# Altium PCB main.PcbDoc (part 1 of 2)
Units mm, origin at the board's own origin, x right, y up, seen from the top; angles counter-clockwise.
Board outline 90 x 95 mm, 4 copper layers (Top L1, GND L2, CLK L3, Bot GND L4), stack 1.59 mm thick; 88 components, 60 nets, 501 pads, 675 vias.
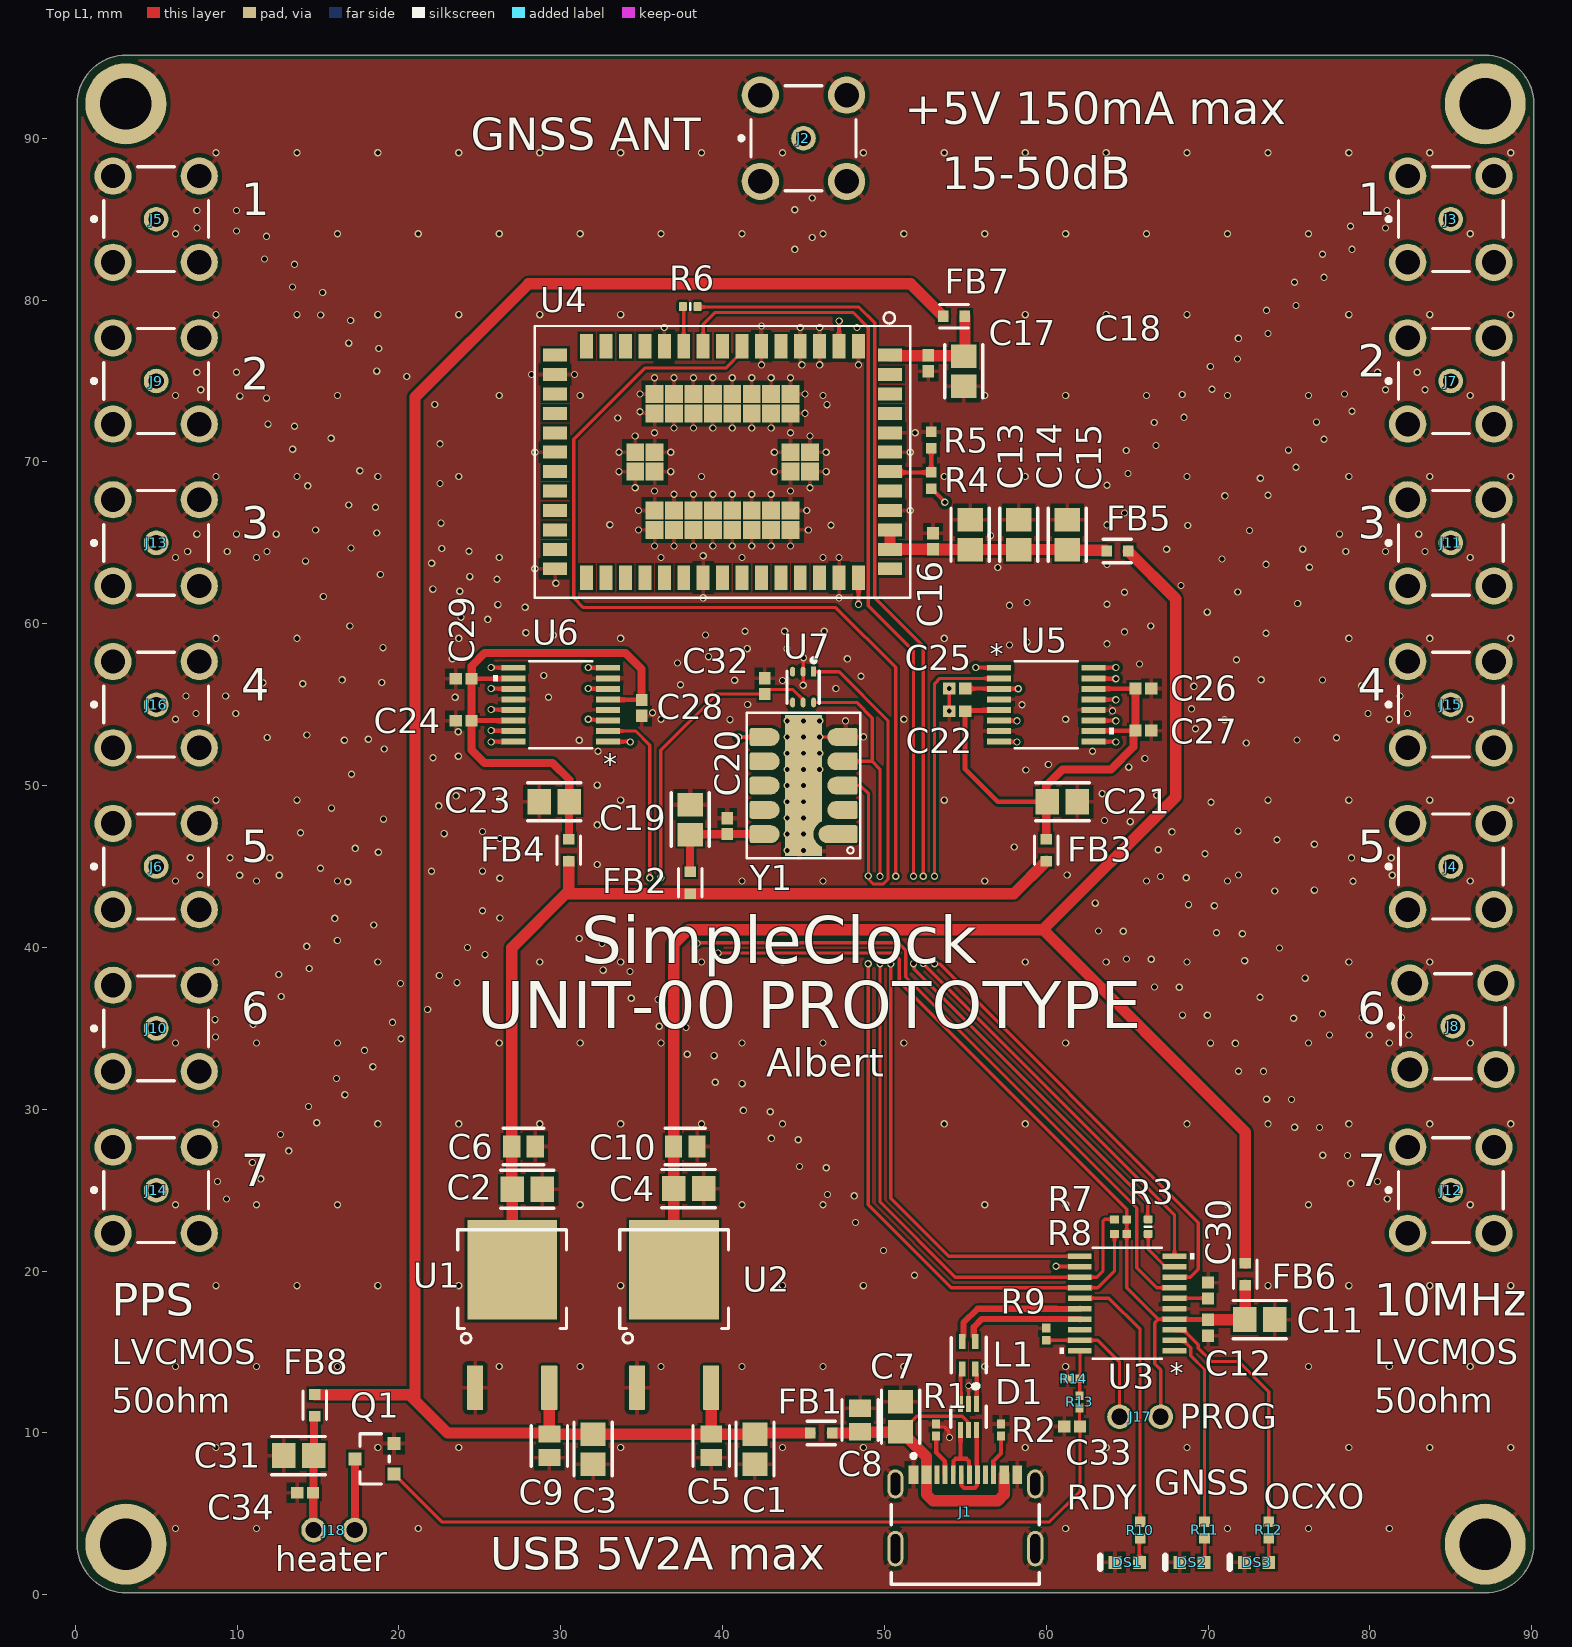
[diagram p0: Top L1 view]
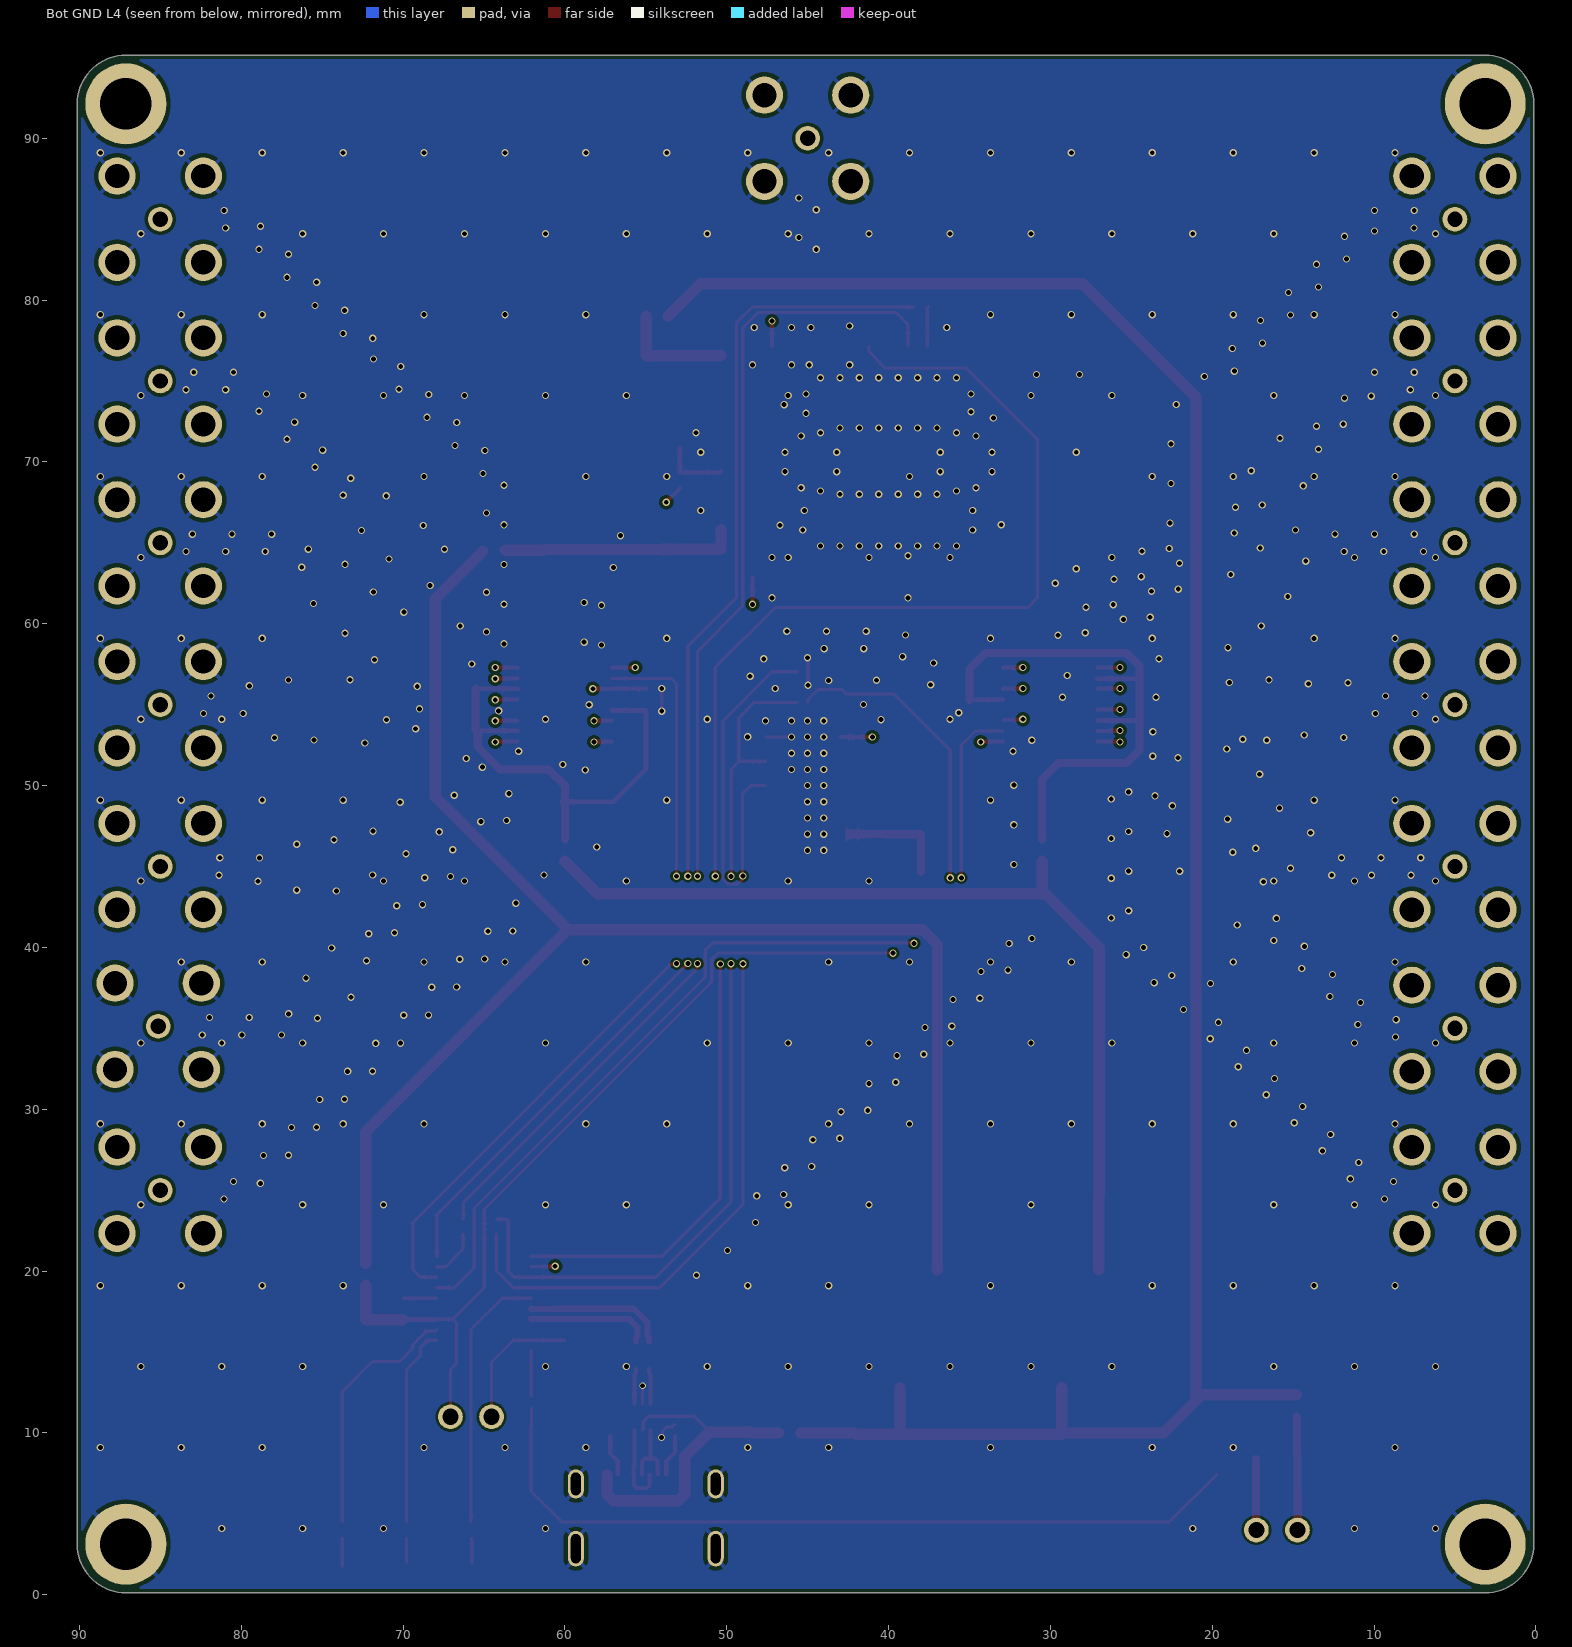
[diagram p1: Bot GND L4 view, seen from below]
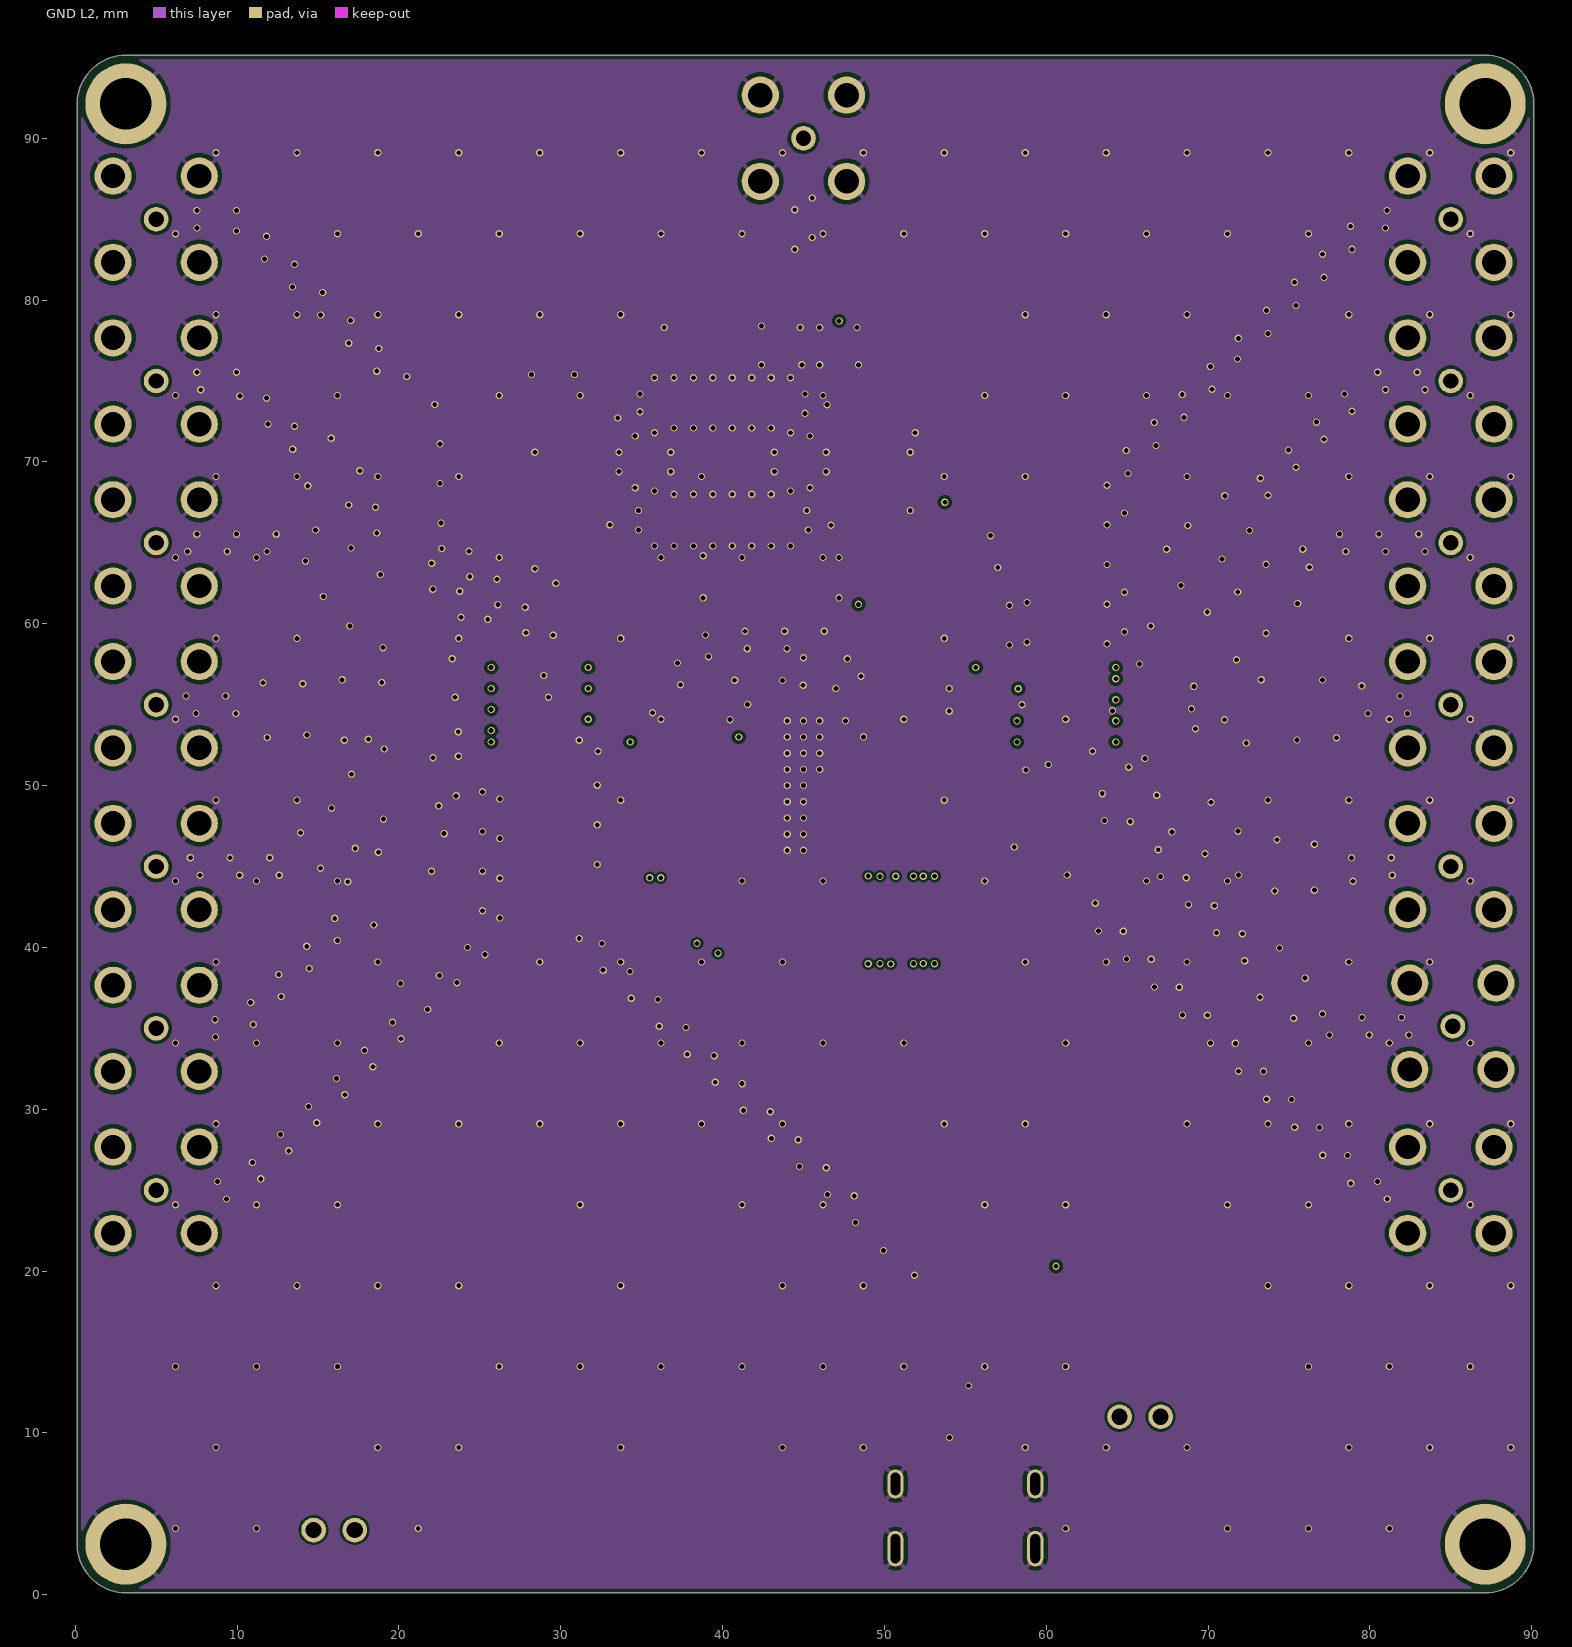
[diagram p2: GND L2]
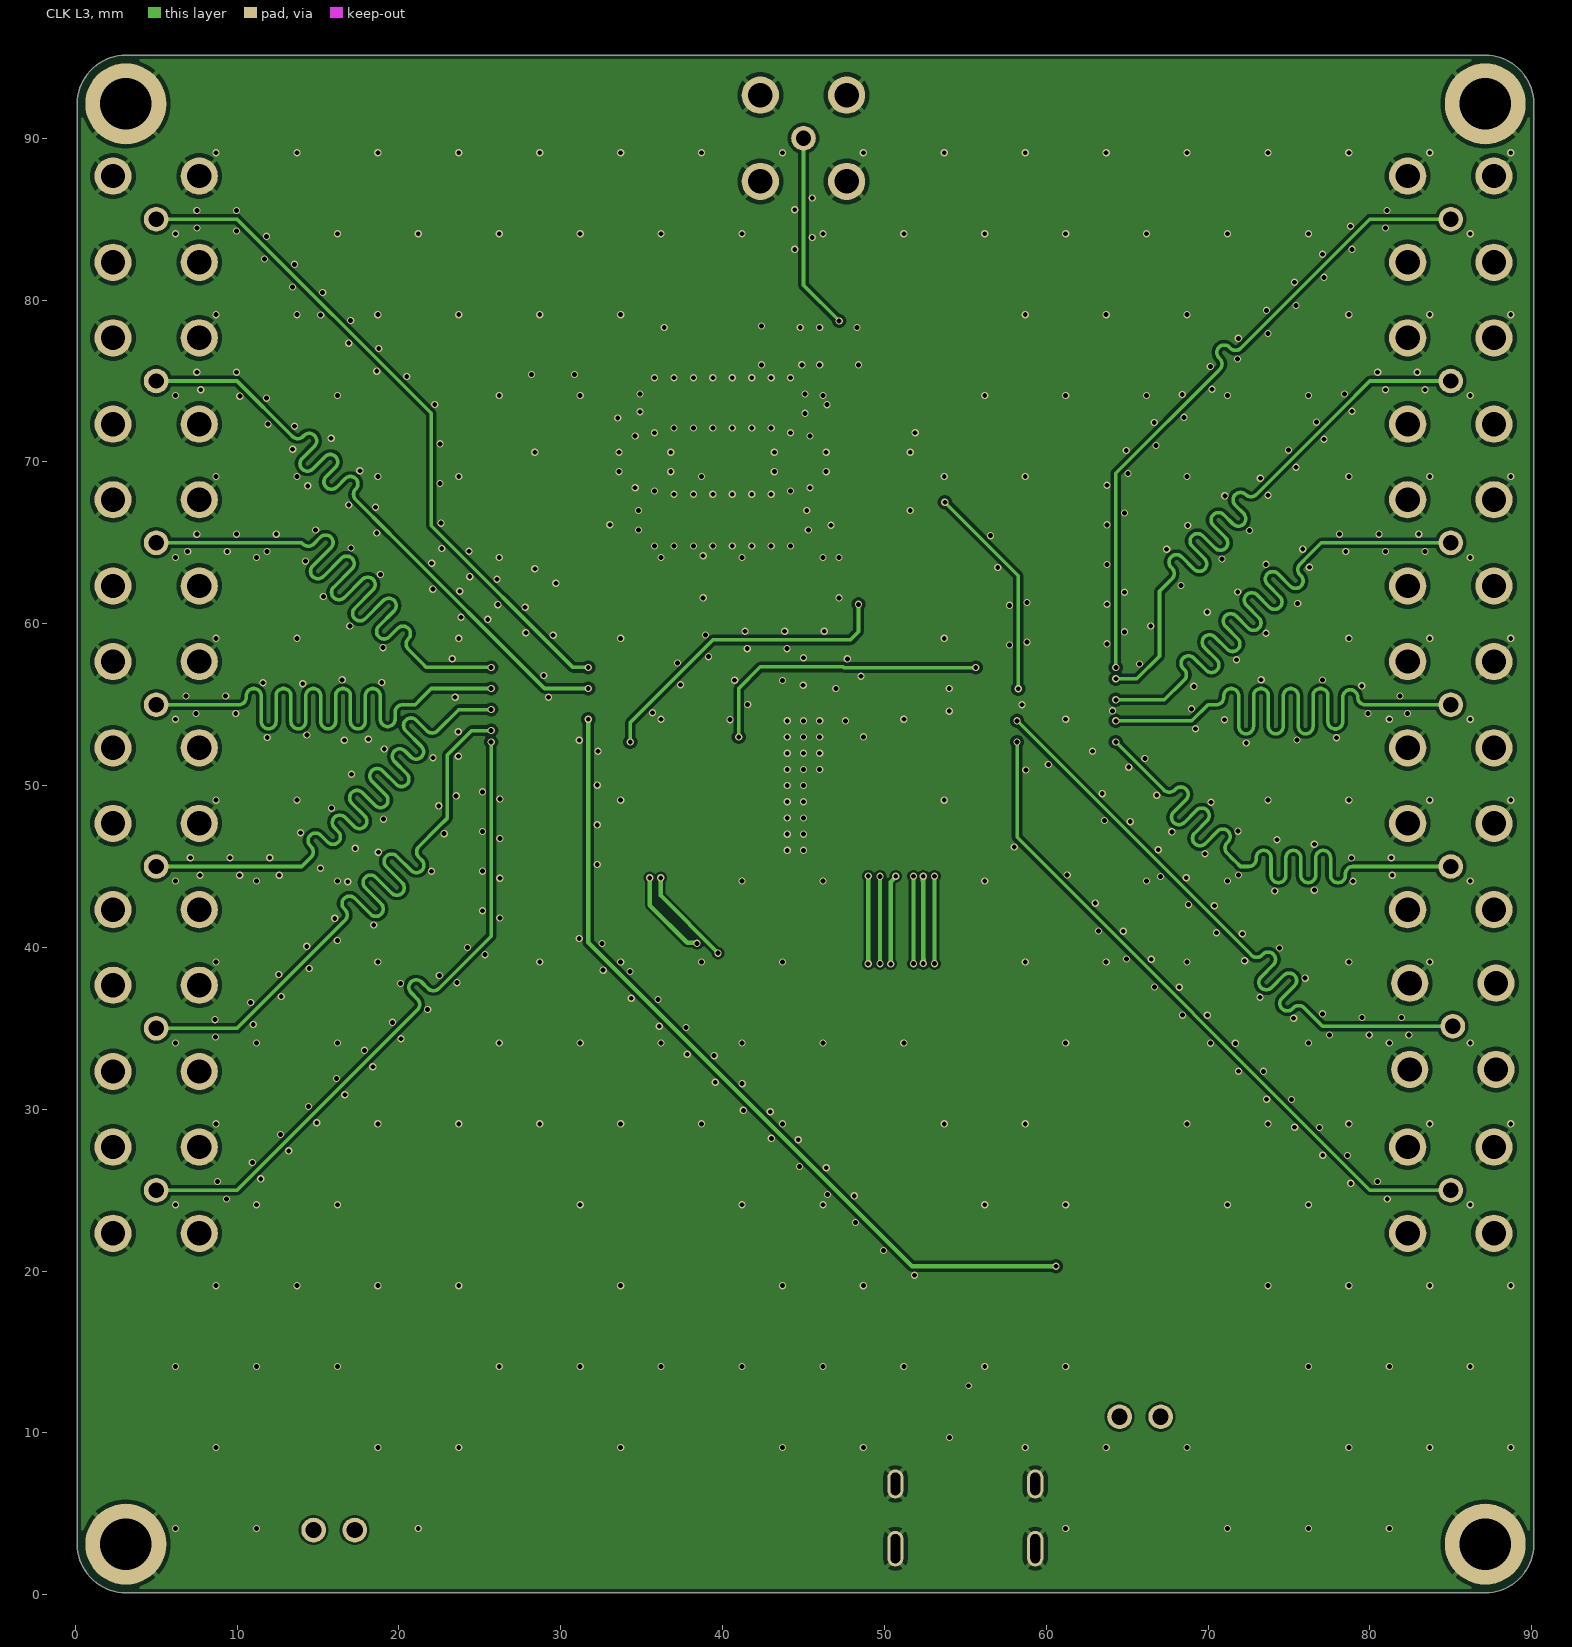
[diagram p3: CLK L3]
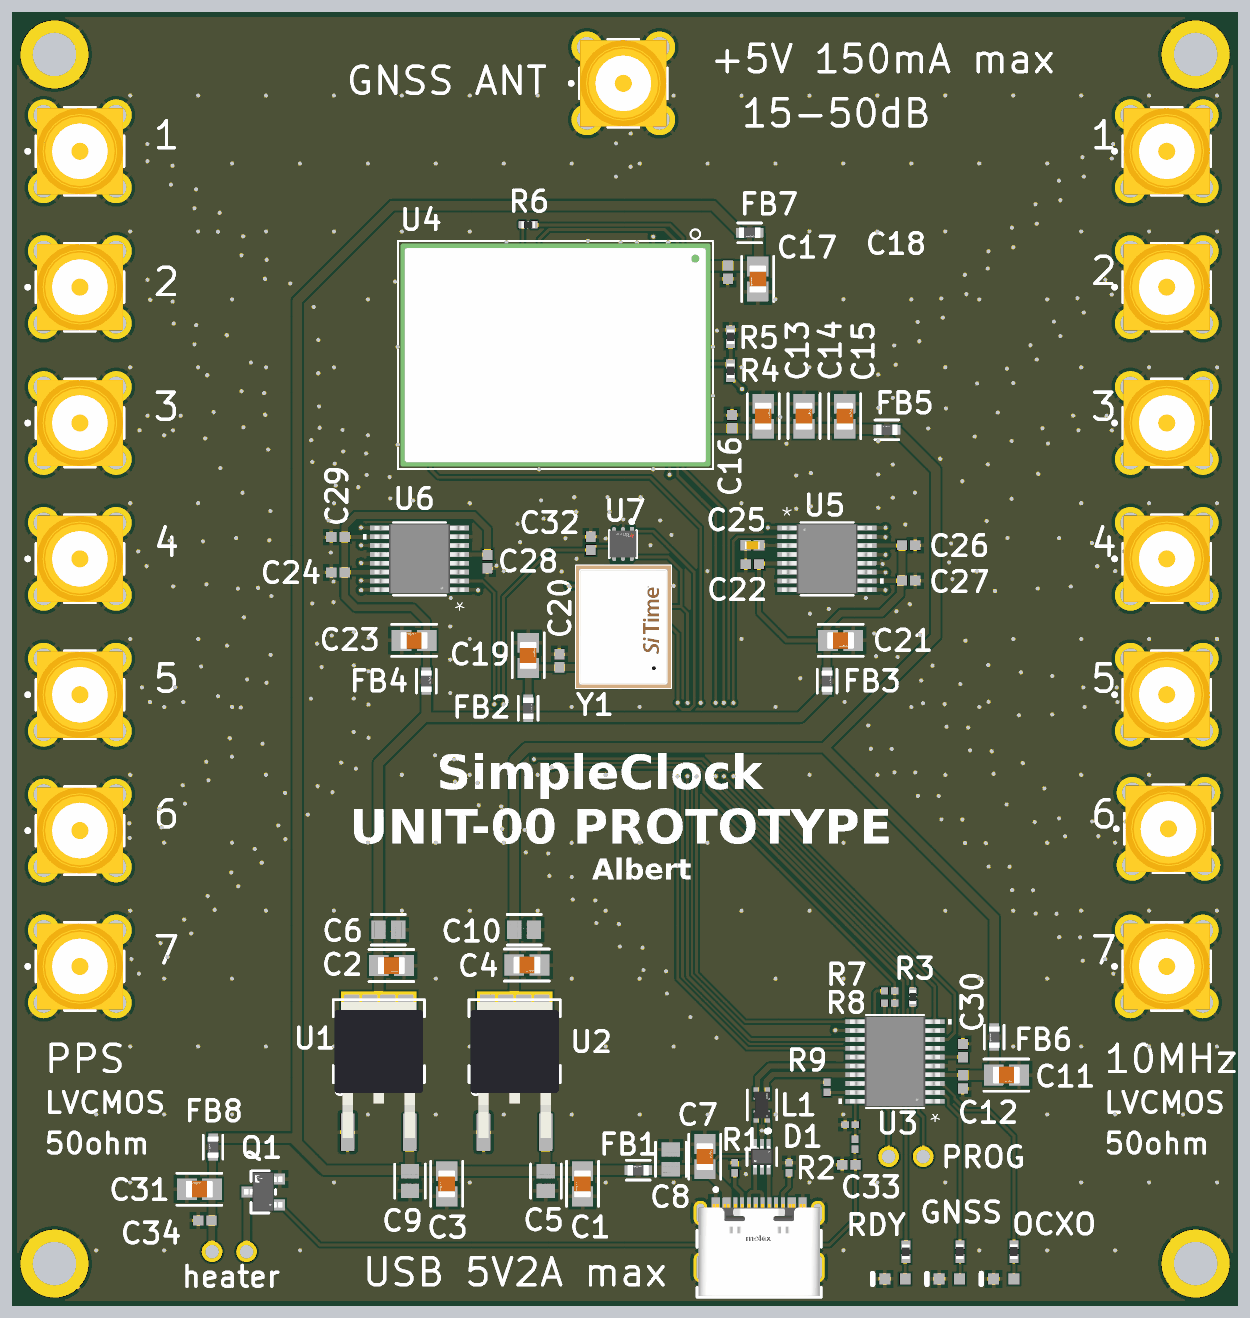
[diagram p5: 3D render of the assembled board from above, using the file's embedded part models]

## Layer stack, top to bottom
Top Solder: solder mask 0.0305, Solder Resist, Dk 3.8
Top L1: signal copper 0.035
Dielectric 2: prepreg 0.2104, 7628, Dk 4.4
GND L2: signal copper 0.0175
Dielectric 1: dielectric 1.064, FR-4, Dk 4.6
CLK L3: signal copper 0.0175
Dielectric 3: prepreg 0.2104, 7628, Dk 4.4
Bot GND L4: signal copper 0.035
Bottom Solder: solder mask 0.0305, Solder Resist, Dk 3.8

## Board outline
0.127,3.127 0.127,92.127 cw(c3.127,92.127) 3.127,95.127 87.127,95.127 cw(c87.127,92.127) 90.127,92.127 90.127,3.127 cw(c87.127,3.127) 87.127,0.127 3.127,0.127 cw(c3.127,3.127)

## Design rules (kind name [scope] priority, off if disabled: settings)
AssemblyTestPointUsage [All] p1: isadvanced=TRUE
AssemblyTestpoint [All] p1: isadvanced=TRUE testpointundercomponent=TRUE minsize=1.016 maxsize=2.54 preferedsize=1.524 minholesize=0 maxholesize=1.016 preferedholesize=0.813 testpointgrid=0.025 usegrid=TRUE gridtolerance=0 allowsidetop=TRUE allowsidebottom=TRUE
BoardOutlineClearance [All] p1: isadvanced=TRUE gap=0.25 ignorepadtopadclearanceinfootprint=FALSE
Clearance 50ohm_clearance [InNetClass('50ohm') vs InNet('GND')] p1: isadvanced=TRUE gap=0.2 ignorepadtopadclearanceinfootprint=TRUE
Clearance Clearance_1 [(ExistsOnLayer('GND L2') Or ExistsOnLayer('CLK L3')) vs (ExistsOnLayer('GND L2') Or ExistsOnLayer('CLK L3'))] p2: gap=0.15 ignorepadtopadclearanceinfootprint=FALSE except(0.1: Arc-Arc Arc-Track Arc-SMDPad Arc-THPad Arc-Text Arc-Hole Track-Track Track-SMDPad Track-THPad Track-Text Track-Hole SMDPad-Text THPad-Text Text-Text Text-Hole) sourcerule=49 cellrowname=All cellrowtype=0 cellcolname=All cellcoltype=0 innerlayers=TRUE
Clearance Clearance_2 [(ExistsOnLayer('Top L1') Or ExistsOnLayer('Bot GND L4')) vs (ExistsOnLayer('Top L1') Or ExistsOnLayer('Bot GND L4'))] p3: gap=0.15 ignorepadtopadclearanceinfootprint=FALSE except(0.1: Arc-Arc Arc-Track Arc-SMDPad Arc-THPad Arc-Text Arc-Hole Track-Track Track-SMDPad Track-THPad Track-Text Track-Hole SMDPad-Text THPad-Text Text-Text Text-Hole) sourcerule=49 cellrowname=All cellrowtype=0 cellcolname=All cellcoltype=0 outerlayers=TRUE
Clearance [All] p4: gap=0.15 ignorepadtopadclearanceinfootprint=FALSE ismatrix=TRUE
ComponentClearance [All] p1: isadvanced=TRUE gap=0.254 collisioncheckmode=3 verticalgap=0.254 showdistances=FALSE
DiffPairsRouting "Schematic Differential Pairs Routing_1" [InDifferentialPairClass('USB_90ohm')] p1: maxlimit=0.254 minlimit=0.2 mostfreqgap=0.254 toplayer_maxgap=0.2 toplayer_prefgap=0.2 toplayer_minwidth=0.26 toplayer_maxwidth=0.26 toplayer_prefwidth=0.26 bottomlayer_maxgap=0.2 bottomlayer_prefgap=0.2 bottomlayer_minwidth=0.26 bottomlayer_maxwidth=0.26 bottomlayer_prefwidth=0.26 impedanceprofiledriven=TRUE impedanceprofileid={2F02EFE7-A818-4EB9-8A8D-3B14D2CF868C} impedanceprofilevalue=90.000000 maxuncoupledlength=12.7
DiffPairsRouting "Schematic Differential Pairs Routing" [InDifferentialPairClass('All Differential Pairs')] p2: maxlimit=0.254 minlimit=0.1 mostfreqgap=0.254 toplayer_minwidth=0.1 toplayer_maxwidth=3 toplayer_prefwidth=0.381 midlayer1_mingap=0.254 midlayer1_minwidth=0.381 midlayer1_maxwidth=0.381 midlayer1_prefwidth=0.381 midlayer2_mingap=0.254 midlayer2_minwidth=0.381 midlayer2_maxwidth=0.381 midlayer2_prefwidth=0.381 bottomlayer_minwidth=0.1 bottomlayer_maxwidth=3 bottomlayer_prefwidth=0.381 maxuncoupledlength=12.7
DiffPairsRouting [All] p3: maxlimit=0.254 minlimit=0.254 mostfreqgap=0.254 toplayer_minwidth=0.381 toplayer_maxwidth=0.381 toplayer_prefwidth=0.381 midlayer1_minwidth=0.381 midlayer1_maxwidth=0.381 midlayer1_prefwidth=0.381 midlayer2_minwidth=0.381 midlayer2_maxwidth=0.381 midlayer2_prefwidth=0.381 bottomlayer_minwidth=0.381 bottomlayer_maxwidth=0.381 bottomlayer_prefwidth=0.381 maxuncoupledlength=12.7
FabricationTestPointUsage [All] p1: isadvanced=TRUE valid=0 allowmultiple=FALSE
FabricationTestpoint [All] p1: isadvanced=TRUE side=3 testpointundercomponent=TRUE minsize=1.016 maxsize=2.54 preferedsize=1.524 minholesize=0 maxholesize=1.016 preferedholesize=0.813 testpointgrid=0.025 allowsidetop=TRUE allowsidebottom=TRUE usegrid=TRUE gridtolerance=0
FanoutControl Fanout_BGA [IsBGA] p1: isadvanced=TRUE bgadir=Out bgaviamode=Centered fanoutstyle=Auto fanoutdirection=Alternating viagrid=0.025 // Fanout_BGA (Default Rule)
FanoutControl Fanout_LCC [IsLCC] p2: isadvanced=TRUE bgadir=Out bgaviamode=Centered fanoutstyle=Auto fanoutdirection=Alternating viagrid=0.025 // Fanout_LCC (Default Rule)
FanoutControl Fanout_SOIC [IsSOIC] p3: isadvanced=TRUE bgadir=Out bgaviamode=Centered fanoutstyle=Auto fanoutdirection=Alternating viagrid=0.025 // Fanout_SOIC (Default Rule)
FanoutControl Fanout_Small [(CompPinCount < 5)] p4: isadvanced=TRUE bgadir=Out bgaviamode=Centered fanoutstyle=Auto fanoutdirection=OutThenIn viagrid=0.025 // Fanout_Small (Default Rule)
FanoutControl Fanout_Default [All] p5: isadvanced=TRUE bgadir=Out bgaviamode=Centered fanoutstyle=Auto fanoutdirection=Alternating viagrid=0.025 // Fanout_Default (Default Rule)
Height [All] p1: isadvanced=TRUE minheight=0 maxheight=25.4 prefheight=12.7
HoleSize [All] p1: isadvanced=TRUE absolutevalues=TRUE maxlimit=10 minlimit=0.3 maxpercent=80.000 minpercent=20.000
HoleToHoleClearance [All] p1: isadvanced=TRUE gap=0.2 allowstackedmicrovias=TRUE
LayerPairs [All] p1: isadvanced=TRUE enforce=TRUE
MatchedLengths MatchedLengths_1 [InNetClass('PPS_match')] p1: isadvanced=TRUE tolerance=25.4 checknetsindiffpair=FALSE checkdiffpairvsdiffpair=TRUE checkxsignals=TRUE checkothers=TRUE usedelayunits=TRUE delaytolerance=10.000000
MatchedLengths 10MHz_match [InNetClass('10MHz_match')] p2: isadvanced=TRUE tolerance=25.4 checknetsindiffpair=FALSE checkdiffpairvsdiffpair=TRUE checkxsignals=TRUE checkothers=TRUE usedelayunits=TRUE delaytolerance=10.000000
MinimumAnnularRing [IsVia] p1: isadvanced=TRUE minimumring=0.05
MinimumSolderMaskSliver [All] p1: isadvanced=TRUE minsoldermaskwidth=0.13
NetAntennae [All] p1: isadvanced=TRUE netantennaetolerance=0
PasteMaskExpansion [All] p1: isadvanced=TRUE expansion=0
PlaneClearance [All] p1: isadvanced=TRUE clearance=0.508
PlaneConnect [All] p1: isadvanced=TRUE planeconnectstyle=Relief reliefexpansion=0.508 reliefentries=4 reliefconductorwidth=0.3 reliefairgap=0.2
PolygonConnect PolygonConnectStyle_1 [InNet('GND')] p1: isadvanced=TRUE thpad.connectstyle=Relief thpad.reliefconductorwidth=0.254 thpad.reliefentries=4 thpad.polygonreliefangle="45 Angle" thpad.airgapwidth=0.254 smdpad.connectstyle=Relief smdpad.reliefconductorwidth=0.254 smdpad.reliefentries=4 smdpad.polygonreliefangle="45 Angle" smdpad.airgapwidth=0.254 smdpad.conductorbypadedge=TRUE smdpad.mindistance=0.254 smdpad.enablemindistance=FALSE via.connectstyle=Direct via.reliefconductorwidth=0.254 via.reliefentries=2 via.polygonreliefangle="0 Angle" via.airgapwidth=0.254
PolygonConnect [All] p2: connectstyle=Relief reliefconductorwidth=0.254 reliefentries=4 polygonreliefangle="90 Angle" airgapwidth=0.254
RoutingCorners [All] p1: isadvanced=TRUE cornerstyle=45-Degree minsetback=2.54 maxsetback=2.54
RoutingPriority [All] p1: isadvanced=TRUE routingpriority=0
RoutingVias [All] p1: holewidth=0.3 width=0.45 viastyle="Through Hole" minholewidth=0.3 minwidth=0.4 maxholewidth=3 maxwidth=3
ShortCircuit [All] p1: isadvanced=TRUE allowed=FALSE
SilkToSilkClearance [All] p1: isadvanced=TRUE silktosilkclearance=0.254
SilkToSolderMaskClearance [IsPad] p1: isadvanced=TRUE minsilkscreentomaskgap=0.25 clearancetoexposedcopper=TRUE
SolderMaskExpansion ViaTenting [IsVia] p1: isadvanced=TRUE expansion=0 istentingtop=TRUE useseparateexpansions=TRUE expansionbottom=0 istentingbottom=TRUE
SolderMaskExpansion [All] p2: isadvanced=TRUE expansion=0.05 istentingtop=FALSE
SupplyNets "Schematic Supply Nets_2" [InNet('GND')] p1: isadvanced=TRUE voltage=0.000
SupplyNets "Schematic Supply Nets_1" [InNet('IN_5V')] p2: isadvanced=TRUE voltage=0.000
SupplyNets "Schematic Supply Nets" [InNet('USB_5V')] p3: isadvanced=TRUE voltage=0.000
UnRoutedNet [All] p1: isadvanced=TRUE
UnpouredPolygon [All] p1: isadvanced=TRUE
Width MaxMinWidth_1 [InNetClass('50ohm')] p1: maxlimit=0.248 minlimit=0.22 preferedwidth=0.248 toplayer_minwidth=0.248 midlayer1_maxwidth=0.22 midlayer1_prefwidth=0.22 midlayer2_maxwidth=0.22 midlayer2_prefwidth=0.22 bottomlayer_minwidth=0.248 impedanceprofiledriven=TRUE impedanceprofileid={BEF96867-CBA8-4214-9458-3ECCB896C18F} impedanceprofilevalue=50.000000 minimp=50.000000 maximp=50.000000 favimp=50.000000
Width [All] p2: maxlimit=3 minlimit=0.1 preferedwidth=0.254 toplayer_prefwidth=0.2 midlayer1_minwidth=0.254 midlayer1_maxwidth=0.254 midlayer2_minwidth=0.254 midlayer2_maxwidth=0.254 bottomlayer_prefwidth=0.2 minimp=50.000000 maximp=50.000000 favimp=50.000000
3 further rules are at their usual default settings.

## Classes and differential pairs
net class PPS_match: PPS_1 PPS_2 PPS_3 PPS_4 PPS_5 PPS_6 PPS_7
net class 10MHz_match: 10MHz_1 10MHz_2 10MHz_3 10MHz_4 10MHz_5 10MHz_6 10MHz_7
differential pair class USB_90ohm: D USB_D
net class 50ohm: 10MHz 10MHz_1 10MHz_2 10MHz_3 10MHz_4 10MHz_5 10MHz_6 10MHz_7 10MHz_ref GPS_ANT NetR4_1 PPS PPS_1 PPS_2 PPS_3 PPS_4 PPS_5 PPS_6 PPS_7 PPS_ref
component class Power_IO: C1 C2 C3 C4 C5 C6 C7 C8 C9 C10 D1 FB1 FB2 FB3 FB4 FB5 FB6 FB7 J1 L1 R1 R2 U1 U2
component class Output_Distribute: C21 C22 C23 C24 C25 C26 C27 C28 C29 J3 J4 J5 J6 J7 J8 J9 J10 J11 J12 J13 J14 J15 J16 U5 U6
component class MCU: C11 C12 C30 C31 C32 C33 C34 DS1 DS2 DS3 FB8 J17 J18 Q1 R3 R7 R8 R9 R10 R11 R12 R13 R14 U3 U7
component class clocks: C13 C14 C15 C16 C17 C18 C19 C20 J2 R4 R5 R6 U4 Y1
differential pair USB_D: +USB_D_P -USB_D_N
differential pair D: +D_P -D_N

## Components (designator, comment, footprint, x,y, rotation, side; value= is the part's Value field where it differs from the comment)
C1 "10uF" FP-GRM21B-0_2-e0_2_0_7-IPC_A 42,9 r270 top
C2 "10uF" FP-GRM21B-0_2-e0_2_0_7-IPC_A 27.929,25.061 r0 top
C3 "10uF" FP-GRM21B-0_2-e0_2_0_7-IPC_A 32,9 r270 top
C4 "10uF" FP-GRM21B-0_2-e0_2_0_7-IPC_A 37.9,25.1 r0 top
C5 "1uF" FP-CL21-IPC_C 39.3,9.2 r270 top
C6 "1uF" FP-CL21-IPC_C 27.7,27.7 r0 top
C7 "10uF" FP-GRM21B-0_2-e0_2_0_7-IPC_A 51,11 r90 top
C8 "1uF" FP-CL21-IPC_C 48.5,10.8 r90 top
C9 "1uF" FP-CL21-IPC_C 29.3,9.2 r270 top
C10 "1uF" FP-CL21-IPC_C 37.7,27.7 r0 top
C11 "10uF" FP-GRM21B-0_2-e0_2_0_7-IPC_A 73.2,17 r0 top
C12 "100nF" CAPC1050X55X23ML05T13 70,16.5 r270 top
C13 "10uF" FP-GRM21B-0_2-e0_2_0_7-IPC_A 55.3,65.5 r90 top
C14 "10uF" FP-GRM21B-0_2-e0_2_0_7-IPC_A 58.3,65.5 r90 top
C15 "10uF" FP-GRM21B-0_2-e0_2_0_7-IPC_A 61.3,65.5 r90 top
C16 "100nF" CAPC1050X55X23ML05T13 53,65.1 r90 top
C17 "10uF" FP-GRM21B-0_2-e0_2_0_7-IPC_A 54.9,75.6 r270 top
C18 "100nF" CAPC1050X55X23ML05T13 52.7,76.1 r270 top
C19 "10uF" FP-GRM21B-0_2-e0_2_0_7-IPC_A 38,47.9 r90 top
C20 "100nF" CAPC1050X55X23ML05T13 40.3,47.5 r270 top
C21 "10uF" FP-GRM21B-0_2-e0_2_0_7-IPC_A 61,49 r0 top
C22 "100nF" CAPC1050X55X23ML05T13 54.5,54.6 r180 top
C23 "10uF" FP-GRM21B-0_2-e0_2_0_7-IPC_A 29.6,49 r180 top
C24 "100nF" CAPC1050X55X23ML05T13 24,54 r180 top
C25 "Capacitor 0.5 pF +/- 0.1pF 25 V 0402" CAPC1005X56X25ML10T15 54.5,56 r180 top value=33pF
C26 "100nF" CAPC1050X55X23ML05T13 66,56 r0 top
C27 "100nF" CAPC1050X55X23ML05T13 66,53.4 r0 top
C28 "100nF" CAPC1050X55X23ML05T13 35,54.8 r270 top
C29 "100nF" CAPC1050X55X23ML05T13 24,56.6 r180 top
C30 "100nF" CAPC1050X55X23ML05T13 70,18.8 r90 top
C31 "10uF" FP-GRM21B-0_2-e0_2_0_7-IPC_A 13.8,8.6 r180 top
C32 "100nF" CAPC1050X55X23ML05T13 42.601,56.147 r90 top
C33 "100nF" CAPC1050X55X23ML05T13 61.6,10.4 r180 top
C34 "100nF" CAPC1050X55X23ML05T13 14.2,6.3 r180 top
D1 "USBLC6-2P6" FP-SOT-666-MFG 55.2,10.995 r270 top
DS1 "LED_W" EVRL-0603-2_V 65,2 r180 top
DS2 "LED_W" EVRL-0603-2_V 69,2 r180 top
DS3 "LED_W" EVRL-0603-2_V 73,2 r180 top
FB1 "BLM18SP601SN1D" FP-BLM18-0_15-t0_8-MFG 46.1,10 r180 top
FB2 "BLM18SP601SN1D" FP-BLM18-0_15-t0_8-MFG 38,44 r90 top
FB3 "BLM18SP601SN1D" FP-BLM18-0_15-t0_8-MFG 60,46 r90 top
FB4 "BLM18SP601SN1D" FP-BLM18-0_15-t0_8-MFG 30.5,46 r90 top
FB5 "BLM18SP601SN1D" FP-BLM18-0_15-t0_8-MFG 64.4,64.5 r180 top
FB6 "BLM18SP601SN1D" FP-BLM18-0_15-t0_8-MFG 72.3,19.8 r270 top
FB7 "BLM18SP601SN1D" FP-BLM18-0_15-t0_8-MFG 54.3,79 r0 top
FB8 "BLM18SP601SN1D" FP-BLM18-0_15-t0_8-MFG 14.8,11.7 r270 top
J1 "217179-0001" FP-2171790001-MFG 55,4 r0 top
J2 "SMA-J-P-H-ST-MT1" FP-SMA-J-P-H-ST-MT1-MFG 45,90 r0 top
J3 "SMA-J-P-H-ST-MT1" FP-SMA-J-P-H-ST-MT1-MFG 85,85 r0 top
J4 "SMA-J-P-H-ST-MT1" FP-SMA-J-P-H-ST-MT1-MFG 85,45 r0 top
J5 "SMA-J-P-H-ST-MT1" FP-SMA-J-P-H-ST-MT1-MFG 5,85 r0 top
J6 "SMA-J-P-H-ST-MT1" FP-SMA-J-P-H-ST-MT1-MFG 5,45 r0 top
J7 "SMA-J-P-H-ST-MT1" FP-SMA-J-P-H-ST-MT1-MFG 85,75 r0 top
J8 "SMA-J-P-H-ST-MT1" FP-SMA-J-P-H-ST-MT1-MFG 85.127,35.127 r0 top
J9 "SMA-J-P-H-ST-MT1" FP-SMA-J-P-H-ST-MT1-MFG 5,75 r0 top
J10 "SMA-J-P-H-ST-MT1" FP-SMA-J-P-H-ST-MT1-MFG 5,35 r0 top
J11 "SMA-J-P-H-ST-MT1" FP-SMA-J-P-H-ST-MT1-MFG 85,65 r0 top
J12 "SMA-J-P-H-ST-MT1" FP-SMA-J-P-H-ST-MT1-MFG 85,25 r0 top
J13 "SMA-J-P-H-ST-MT1" FP-SMA-J-P-H-ST-MT1-MFG 5,65 r0 top
J14 "SMA-J-P-H-ST-MT1" FP-SMA-J-P-H-ST-MT1-MFG 5,25 r0 top
J15 "SMA-J-P-H-ST-MT1" FP-SMA-J-P-H-ST-MT1-MFG 85,55 r0 top
J16 "SMA-J-P-H-ST-MT1" FP-SMA-J-P-H-ST-MT1-MFG 5,55 r0 top
J17 "2p header" "New footprint 1" 65.8,11 r0 top
J18 "2p header" "New footprint 1" 16,4 r0 top
L1 "DLW21HN900SQ2L" FP-DLW21HN-MFG 55.2,14.8 r90 top
Q1 "AO3400A" FP-SOT23-MFG 18.5,8.4 r180 top
R1 "5.1k" RESC1005X40X25LL10T10 53.2,10.175 r90 top
R2 "5.1k" RESC1005X40X25LL10T10 57.2,10.175 r90 top
R3 "22R2J" RESC0402(1005)_L 66.3,22.75 r270 top value=22
R4 "Resistor 1k +/-1% 0402 100 mW" RESC1005X40X25ML05T05 52.897,68.851 r270 top value=1k
R5 "Resistor 1k +/-1% 0402 100 mW" RESC1005X40X25ML05T05 52.897,71.351 r270 top value=1k
R6 "22R2J" RESC0402(1005)_L 38,79.6 r0 top value=22
R7 "5.1k" RESC1005X40X25LL10T10 64.6,23.2 r0 top
R8 "5.1k" RESC1005X40X25LL10T10 64.6,22.3 r0 top
R9 "5.1k" RESC1005X40X25LL10T10 60,16.1 r90 top
R10 "Resistor 1k +/-1% 0402 100 mW" RESC1005X40X25ML05T05 65.8,4 r90 top value=1k
R11 "Resistor 1k +/-1% 0402 100 mW" RESC1005X40X25ML05T05 69.779,4.007 r90 top value=1k
R12 "Resistor 1k +/-1% 0402 100 mW" RESC1005X40X25ML05T05 73.752,4.007 r90 top value=1k
R13 "5.1k" RESC1005X40X25LL10T10 62.056,11.92 r90 top
R14 "100k" RESC1005X40X25LL10T10 61.706,13.352 r180 top
U1 "TLV76133KVU" TO-252-3_KVU_TI_TABPIN2 27,19.5 r90 top
U2 "TLV76133KVU" TO-252-3_KVU_TI_TABPIN2 37,19.5 r90 top
U3 "STM32C071FBP6" TSSOP20_STM 65,18 r180 top
U4 "mosaic-G5-T" MOSAIC-G5_LGA54_22P8X16P4 40,70 r0 top
U5 "LMK1C1108APWR" TSSOP16_4P5X5P1_TEX 60,55 r0 top
U6 "LMK1C1108APWR" TSSOP16_4P5X5P1_TEX 30,55 r180 top
U7 "TMP117AIDRVR" FP-DRV0006B-IPC_C 44.975,56.088 r270 top
Y1 "SIT5801AB-KV033JV-10" SiT5801_K_9x7_LGA11 45,50 r270 top

## Footprints (in the part's own frame and the unit in brackets; to place one, negate y for a bottom-side part, rotate by r counter-clockwise, add the part's x,y. Pads: shape width x height; smd on the part's side, far side on the other; paste and mask are expansions set on the pad)
CAPC1005X56X25ML10T15 [mm] "Chip Capacitor, 2-Leads, Body 1.10x0.60mm, IPC Low Density"
  rect 0.78x0.74 smd: 1(-0.49,0) 2(0.49,0)
  body extent -0.55,-0.3 0.55,0.3, height 0.56
CAPC1050X55X23ML05T13 [mm] "Chip Capacitor, 2-Leads, Body 1.05x0.55mm, IPC Low Density"
  rect 0.76x0.72 smd: 1(-0.49,0) 2(0.49,0)
  body extent -0.53,-0.28 0.53,0.27, height 0.55
EVRL-0603-2_V [mm] "SMD, 2-Leads, Body 1.6x0.8mm"
  rect 0.8x0.8 smd: 1(-0.75,0) 2(0.75,0)
  silkscreen extent 1.65,-0.4 1.65,0.4, body extent -0.8,-0.4 0.8,0.4, height 0.5
FP-2171790001-MFG [mm]
  rrect100% 1x1.8 hole 1.4 slot 0.6 at 0 deg paste-2539.97 mask+0: 1(-4.32,2.85) 2(4.32,2.85)
  rrect100% 1x2.2 hole 1.8 slot 0.6 at 0 deg paste-2539.97 mask+0: 3(-4.32,-1.15) 4(4.32,-1.15)
  rect 0.6x1.15 smd paste+0 mask+0: A1-B12(-3.2,3.425) A4-B9(-2.4,3.425) B1-A12(3.2,3.425) B4-A9(2.4,3.425)
  rect 0.3x1.15 smd paste+0 mask+0: A5(-1.25,3.425) A6(-0.25,3.425) A7(0.25,3.425) A8(1.25,3.425) B5(1.75,3.425) B6(0.75,3.425) B7(-0.75,3.425) B8(-1.75,3.425)
  silkscreen extent -4.57,-3.35 4.57,4.7, body extent -4.92,-3.45 4.92,4.1, height 0.25
FP-BLM18-0_15-t0_8-MFG [mm]
  rect 0.65x0.7 smd paste+0 mask+0: 1(-0.675,0) 2(0.675,0)
  silkscreen extent -0.87,-0.72 0.87,0.72, body extent -1.1,-0.58 1.1,0.58, height 0.25
FP-CL21-IPC_C [mm]
  rect 1.055x1.356 smd paste+0 mask+0: 1(-0.726,0) 2(0.726,0)
  silkscreen extent -1.25,-1.12 1.25,1.12, body extent -1.35,-0.82 1.35,0.82, height 0.25
FP-DLW21HN-MFG [mm]
  rect 0.9x0.4 smd paste-1000 mask+0: 1(-0.85,-0.4) 2(0.85,-0.4) 3(0.85,0.4) 4(-0.85,0.4)
  silkscreen extent -2.05,-1.09 1.11,1.07, body extent -1.4,-0.8 1.4,0.8, height 0.25
FP-DRV0006B-IPC_C [mm]
  rect 0.611x0.292 smd paste+0 mask+0: 1(-0.951,0.65)
  rrect100% 0.611x0.292 smd paste+0 mask+0: 2(-0.951,0) 3(-0.951,-0.65) 4(0.951,-0.65) 5(0.951,0) 6(0.951,0.65)
  silkscreen extent -1.78,-1 1,1, body extent -1.36,-1.1 1.36,1.1, height 0.25
FP-GRM21B-0_2-e0_2_0_7-IPC_A [mm]
  rect 1.455x1.556 smd paste+0 mask+0: 1(-0.926,0) 2(0.926,0)
  silkscreen extent -1.65,-1.18 1.65,1.18, body extent -2.15,-1.28 2.15,1.28, height 0.25
FP-SMA-J-P-H-ST-MT1-MFG [mm]
  round 1.524 hole 0.95: 1(0,0)
  round 2.3 hole 1.5 paste-2539.97 mask+0: 2(-2.665,2.665) 3(2.665,2.665) 4(-2.665,-2.665) 5(2.665,-2.665)
  silkscreen extent -3.96,-3.24 3.24,3.24, body extent -3.92,-3.92 3.92,3.92, height 0.25
FP-SOT23-MFG [mm]
  rect 0.8x0.8 smd paste+0 mask+0: 1(-1.2,0.95) 2(-1.2,-0.95) 3(1.2,0)
  silkscreen extent -0.9,-1.55 0.9,1.55, body extent -1.7,-1.78 1.7,1.78, height 0.25
FP-SOT-666-MFG [mm]
  rect 0.99x0.3 smd paste+0 mask+0: 1(-0.805,0.5) 2(-0.805,0) 3(-0.805,-0.5) 4(0.805,-0.5) 5(0.805,0) 6(0.805,0.5)
  silkscreen extent -2.02,-1.1 0.65,1.1, body extent -1.4,-0.95 1.4,0.95, height 0.25
MOSAIC-G5_LGA54_22P8X16P4 [mm] "Septentrio mosaic-G5 family LGA: 54 numbered perimeter pads plus 40 internal ground lands, 22.80 x 16.40 x 2.40 mm. Copper geometry and 0.05 mm NSMD solder-mask expansion follow mosaic-G5 Hardware Manual v2.0.0. Internal lands use designators G01-G40 and map collectively to schematic pin G. Paste apertures remain governed by the PCB paste-mask rule."
  rect 0.8x1.5 smd mask+0.05: 1(8.4,7.15) 2(7.2,7.15) 3(6,7.15) 4(4.8,7.15) 5(3.6,7.15) 6(2.4,7.15) 7(1.2,7.15) 8(0,7.15) 9(-1.2,7.15) 10(-2.4,7.15) 11(-3.6,7.15) 12(-4.8,7.15) 13(-6,7.15) 14(-7.2,7.15) 15(-8.4,7.15) 28(-8.4,-7.15) 29(-7.2,-7.15) 30(-6,-7.15) 31(-4.8,-7.15) 32(-3.6,-7.15) 33(-2.4,-7.15) 34(-1.2,-7.15) 35(0,-7.15) 36(1.2,-7.15) 37(2.4,-7.15) 38(3.6,-7.15) 39(4.8,-7.15) 40(6,-7.15) 41(7.2,-7.15) 42(8.4,-7.15)
  rect 1.5x0.8 smd mask+0.05: 16(-10.35,6.6) 17(-10.35,5.4) 18(-10.35,4.2) 19(-10.35,3) 20(-10.35,1.8) 21(-10.35,0.6) 22(-10.35,-0.6) 23(-10.35,-1.8) 24(-10.35,-3) 25(-10.35,-4.2) 26(-10.35,-5.4) 27(-10.35,-6.6) 43(10.35,-6.6) 44(10.35,-5.4) 45(10.35,-4.2) 46(10.35,-3) 47(10.35,-1.8) 48(10.35,-0.6) 49(10.35,0.6) 50(10.35,1.8) 51(10.35,3) 52(10.35,4.2) 53(10.35,5.4) 54(10.35,6.6)
  rect 1.1x1.1 smd mask+0.05: G01(-5.4,-0.6) G01(-5.4,0.6) G01(-4.2,-4.2) G01(-4.2,-3) G01(-4.2,-0.6) G01(-4.2,0.6) G01(-4.2,3) G01(-4.2,4.2) G01(-3,-4.2) G01(-3,-3) G01(-3,3) G01(-3,4.2) G01(-1.8,-4.2) G01(-1.8,-3) G01(-1.8,3) G01(-1.8,4.2) G01(-0.6,-4.2) G01(-0.6,-3) G01(-0.6,3) G01(-0.6,4.2) G01(0.6,-4.2) G01(0.6,-3) G01(0.6,3) G01(0.6,4.2) G01(1.8,-4.2) G01(1.8,-3) G01(1.8,3) G01(1.8,4.2) G01(3,-4.2) G01(3,-3) G01(3,3) G01(3,4.2) G01(4.2,-4.2) G01(4.2,-3) G01(4.2,-0.6) G01(4.2,0.6) G01(4.2,3) G01(4.2,4.2) G01(5.4,-0.6) G01(5.4,0.6)
  silkscreen extent -11.6,-8.4 11.6,9.25, body extent -11.4,-8.2 11.4,8.2, height 2.4
"New footprint 1" [mil]
  round 60 hole 39.37: 1(-50,0) 2(50,0)
RESC0402(1005)_L [mm] "Chip Resistor, Body 1.0x0.5mm, IPC High Density"
  rrect25% 0.5x0.55 smd: 1(-0.45,0) 2(0.45,0)
  silkscreen extent 0,-0.2 0,0.2, body extent -0.5,-0.25 0.5,0.25, height 0.3
RESC1005X40X25LL10T10 [mm] "Chip Resistor, 2-Leads, Body 1.00x0.50mm, IPC High Density"
  rect 0.55x0.5 smd: 1(-0.375,0) 2(0.375,0)
  body extent -0.55,-0.3 0.55,0.3, height 0.4
RESC1005X40X25ML05T05 [mm] "Chip Resistor, 2-Leads, Body 1.05x0.55mm, IPC Low Density"
  rect 0.65x0.65 smd: 1(-0.5,0) 2(0.5,0)
  body extent -0.53,-0.28 0.53,0.28, height 0.4
SiT5801_K_9x7_LGA11 [mm] "SiTime SiT5801 9.0 x 7.0 mm LGA-11, Rev 0.26 recommended land pattern. All ten peripheral lands use asymmetric end radii: pins 1-5 have R0.15 outer/top corners and R0.55 inner/bottom ends; pins 6-10 have R0.55 inner/top ends and R0.25 outer/bottom corners. Pin 1 is extended inward per the 1.85-mm top-edge-to-arc-centre dimension. Pin 11 is a compound GND land with a conservative 25-um staircase approximation of the R0.85 concave recess; nominal radial Pin1-to-GND clearance 0.30 mm."
  rrect50% 1.1x0.3 smd: 1(3,3.175) 2(1.5,3.175) 3(0,3.175) 4(-1.5,3.175) 5(-3,3.175)
  round 1.1 smd: 1(3,1.475) 2(1.5,2.025) 3(0,2.025) 4(-1.5,2.025) 5(-3,2.025) 6(-3,-2.025) 7(-1.5,-2.025) 8(0,-2.025) 9(1.5,-2.025) 10(3,-2.025)
  rect 1.1x1.7 smd: 1(3,2.325)
  rect 1.1x1.15 smd: 2(1.5,2.6) 3(0,2.6) 4(-1.5,2.6) 5(-3,2.6)
  rect 1.1x1.05 smd: 6(-3,-2.55) 7(-1.5,-2.55) 8(0,-2.55) 9(1.5,-2.55) 10(3,-2.55)
  rrect50% 1.1x0.5 smd: 6(-3,-3.075) 7(-1.5,-3.075) 8(0,-3.075) 9(1.5,-3.075) 10(3,-3.075)
  rect 6.565x0.025 smd: 11(-1.068,1.138)
  rect 6.575x0.025 smd: 11(-1.062,1.112)
  rect 6.587x0.025 smd: 11(-1.056,1.088)
  rect 6.6x0.025 smd: 11(-1.05,1.062)
  rect 6.614x0.025 smd: 11(-1.043,1.038)
  rect 6.629x0.025 smd: 11(-1.036,1.012)
  rect 6.645x0.025 smd: 11(-1.027,0.988)
  rect 6.663x0.025 smd: 11(-1.019,0.962)
  rect 6.682x0.025 smd: 11(-1.009,0.937)
  rect 6.702x0.025 smd: 11(-0.999,0.913)
  rect 6.724x0.025 smd: 11(-0.988,0.887)
  rect 6.748x0.025 smd: 11(-0.976,0.863)
  rect 6.774x0.025 smd: 11(-0.963,0.837)
  rect 6.802x0.025 smd: 11(-0.949,0.813)
  rect 6.833x0.025 smd: 11(-0.933,0.787)
  rect 6.868x0.025 smd: 11(-0.916,0.763)
  rect 6.906x0.025 smd: 11(-0.897,0.737)
  rect 6.95x0.025 smd: 11(-0.875,0.713)
  rect 7.001x0.025 smd: 11(-0.85,0.687)
  rect 7.063x0.025 smd: 11(-0.819,0.663)
  rect 7.145x0.025 smd: 11(-0.777,0.637)
  rect 8.7x1.775 smd: 11(0,-0.262)
  rect 1.145x0.025 smd: 11(3.777,0.637)
  rect 1.063x0.025 smd: 11(3.819,0.663)
  rect 1.001x0.025 smd: 11(3.85,0.687)
  rect 0.95x0.025 smd: 11(3.875,0.713)
  rect 0.906x0.025 smd: 11(3.897,0.737)
  rect 0.868x0.025 smd: 11(3.916,0.763)
  rect 0.833x0.025 smd: 11(3.933,0.787)
  rect 0.802x0.025 smd: 11(3.949,0.813)
  rect 0.774x0.025 smd: 11(3.963,0.837)
  rect 0.748x0.025 smd: 11(3.976,0.863)
  rect 0.724x0.025 smd: 11(3.988,0.887)
  rect 0.702x0.025 smd: 11(3.999,0.913)
  rect 0.682x0.025 smd: 11(4.009,0.937)
  rect 0.663x0.025 smd: 11(4.019,0.962)
  rect 0.645x0.025 smd: 11(4.027,0.988)
  rect 0.629x0.025 smd: 11(4.036,1.012)
  rect 0.614x0.025 smd: 11(4.043,1.038)
  rect 0.6x0.025 smd: 11(4.05,1.062)
  rect 0.587x0.025 smd: 11(4.056,1.088)
  rect 0.575x0.025 smd: 11(4.062,1.112)
  rect 0.565x0.025 smd: 11(4.068,1.138)
  silkscreen extent -4.5,-3.5 4.5,3.5, body extent -4.5,-3.5 4.5,3.5, height 3.6
TO-252-3_KVU_TI_TABPIN2 [mm] "TI KVU0003A TO-252 land pattern for TLV76133KVU; short centre lead and large exposed tab are both electrically pad 2 (OUT)"
  rrect10% 2.75x1 smd: 1(-6.7,2.29) 3(-6.7,-2.29)
  rect 6.15x5.55 smd paste-4: 2(0.575,0)
  rrect10% 0.98x1.13 on Top Paste: ""(-1.785,-1.995) ""(-1.785,-0.665) ""(-1.785,0.665) ""(-1.785,1.995) ""(-0.605,1.995) ""(-0.605,-0.665) ""(-0.605,0.665) ""(-0.605,-1.995) ""(0.575,1.995) ""(0.575,-0.665) ""(0.575,0.665) ""(0.575,-1.995) ""(1.755,-1.995) ""(1.755,-0.665) ""(1.755,0.665) ""(1.755,1.995) ""(2.935,-1.995) ""(2.935,-0.665) ""(2.935,0.665) ""(2.935,1.995)
  silkscreen extent -3.95,-3.36 3.05,3.36, body extent -7.11,-3.35 2.59,3.35, height 2.52
TSSOP16_4P5X5P1_TEX [mm]
  rect 1.462x0.355 smd paste+0 mask+0: 1(-2.921,2.275) 2(-2.921,1.625) 3(-2.921,0.975) 4(-2.921,0.325) 5(-2.921,-0.325) 6(-2.921,-0.975) 7(-2.921,-1.625) 8(-2.921,-2.275) 9(2.921,-2.275) 10(2.921,-1.625) 11(2.921,-0.975) 12(2.921,-0.325) 13(2.921,0.325) 14(2.921,0.975) 15(2.921,1.625) 16(2.921,2.275)
  silkscreen extent -1.95,-2.68 4.16,2.68, body extent -3.3,-2.55 3.3,2.55, height 1.2
TSSOP20_STM [mm]
  rect 1.462x0.355 smd paste+0 mask+0: 1(-2.921,2.925) 2(-2.921,2.275) 3(-2.921,1.625) 4(-2.921,0.975) 5(-2.921,0.325) 6(-2.921,-0.325) 7(-2.921,-0.975) 8(-2.921,-1.625) 9(-2.921,-2.275) 10(-2.921,-2.925) 11(2.921,-2.925) 12(2.921,-2.275) 13(2.921,-1.625) 14(2.921,-0.975) 15(2.921,-0.325) 16(2.921,0.325) 17(2.921,0.975) 18(2.921,1.625) 19(2.921,2.275) 20(2.921,2.925)
  silkscreen extent -4.16,-3.43 4.16,3.43, body extent -3.3,-3.3 3.3,3.3, height 1.2

## Part data
C1 C2 C3 C4 C7 C11 C13 C14 C15 C17 C19 C21 C23 C31: library part CMP-06035-004402-1, "Chip Multilayer Ceramic Capacitors for General Purpose, 0805, 10uF, X5R, 15%, 10%, 50V", Dielectric=X5R, JLCPCB=C440198, Tolerance=10%, Voltage Rating (DC)=50V, Capacitance=10uF, Length=2mm, Thickness=1.25mm, Width=1.25mm
C5 C6 C8 C9 C10: library part CMP-13271-004196-1, "CL21 Series 0805 1uF 50V ±10% Tolerance X7R Multilayer Ceramic Chip Capacitor", Case Code (Imperial)=0805, Case Code (Metric)=2012, Dielectric=X7R, JLCPCB=C28323, Max Operating Temperature=125°C, Min Operating Temperature=-55°C, Package Quantity=1, Tolerance=10%, Voltage Rating=50V, Capacitance=1uF, Case/Package=0805, Depth=1.25mm, Height=1.25mm, Length=0.079inch, Mount="Surface Mount", Packaging="Tape and Reel", Radiation Hardening=No, Thickness=0.053inch, Width=0.049inch
C12 C16 C18 C20 C22 C24 C26 C27 C28 C29 C30 C32 C33 C34: library part CMP-2000-05439-1, "Chip Capacitor, 100 nF, +/- 10%, 16 V, -55 to 125 degC, 0402 (1005 Metric), RoHS, Tape and Reel", Capacitance=100000pF, Case Size/Dimension=0402, Dielectric=X7R, JLCPCB=C1525, Manufacturer="Samsung Electro-Mechanics", Rated Voltage=16V, Tolerance (%)=±10%, Datasheet URL=https://datasheet.ciiva.com/29198/458718-da-01-en-vs-kondensator-0402-29198423.pdf, Datasheet Version=Nov-10, Manufacturer URL=http://www.samsungsem.com/global/index.jsp
C25: library part CMP-001-00002-6, Capacitor Type=Ceramic, Case/Package=0402, JLCPCB=C76905, Max Operating Temperature=125°C, Min Operating Temperature=-55°C, Tolerance=20%, Voltage Rating=25V, Mounting Technology=SM, Pins=2, RoHS Compliant=True
D1: library part CMP-12225-000058-1, "TVS DIODE 5.25V 17V SOT666", Breakdown Voltage=6V, Capacitance=3.5pF, Case/Package=SOT-666, Clamping Voltage=17V, JLCPCB=C15999, Leakage Current=150nA, Max Operating Temperature=125°C, Min Operating Temperature=-40°C, Operating Supply Voltage=5V, Package Quantity=1, Peak Pulse Current=5A, Power Line Protection=Yes, Test Current=1mA, Contact Plating=Tin, Depth=1.3mm, Direction=Unidirectional, Element Configuration=Dual, ESD Protection=Yes, Height=0.6mm, Lead Free="Lead Free", Length=1.7mm, Max Breakdown Voltage=6V, Max Reverse Leakage Current=150nA, Min Breakdown Voltage=6V, Mount="Surface Mount", Number of Bidirectional Channels=2, Number of Channels=2, Number of Elements=1, Number of Pins=6, Packaging="Tape and Reel", Polarity=Unidirectional, Radiation Hardening=No, REACH SVHC="No SVHC", Reverse Breakdown Voltage=6V, Reverse Standoff Voltage=5V, Termination=SMD/SMT, Width=1.3mm, Working Voltage=5V
DS1 DS2 DS3: library part CMP-007-00002-2, "Chip LED, white", Case/Package=0603, Colour=Green, Forward Voltage=2V, JLCPCB=C2290, Manufacturer="Everlight Electronics", Package Description="2-Pin Surface Mount Device, Body 1.6 x 0.8 mm", Datasheet URL=https://datasheet.ciiva.com/48679/19-217-g7c-an1p2-3t-48679179.pdf, Datasheet Version="Rev. 1, 04/2006", Lens Style=Clear, Manufacturer URL=http://www.everlight.com/, Mounting Technology=SM, Package Reference=0603, Pins=2, RoHS Compliant=True, Viewing Angle=120degrees
FB1 FB2 FB3 FB4 FB5 FB6 FB7 FB8: library part CMP-00260-111572297-1, "BLM18SP601SN1D Ferrite Bead, 600 Ohm, 1.5A, 0603 Rohs Compliant: Yes", Case/Package=0603, JLCPCB=C3716583, Max Operating Temperature=125°C, Min Operating Temperature=-55°C, Resistance=140mΩ, RMS Current (Irms)=1.5A, Test Frequency=100MHz, Tolerance=25%, Core Material=Ferrite, Height=950µm, Lifecycle Status=Production, NexarPartId=111572297, Series Resistance=140mΩ
J1: library part CMP-04767-000028-2, "CONN RCP USB2.0 TYP C 16P SMD RA", Current Rating=1.25A, JLCPCB=C3197684, Max Operating Temperature=85°C, Min Operating Temperature=-40°C, Voltage Rating=30V, Contact Material="Gold, Nickel", Gender=Receptacle, Height=3.36mm, NexarPartId=117190526, Number of Contacts=16, USB Standard="USB 2.0"
J2 J3 J4 J5 J6 J7 J8 J9 J10 J11 J12 J13 J14 J15 J16: library part CMP-002-00073-1, "RF Connectors / Coaxial Connectors 6 GHz, 50 Ohm SMA Jack or Plug, Cable Connector", Case/Package=SMA, Mounting Technology="Through Hole"
J17 J18: library part CMP-002-00072-1, "simple 2p header"
L1: library part CMP-06045-000050-1, "CMC 330MA 2LN 90 OHM SMD", Case Code (Imperial)=0805, Current=330mA, DC Resistance (DCR)=350mR, Frequency=100MHz, JLCPCB=C80529, Max Operating Temperature=85°C, Min Operating Temperature=-40°C, Package Quantity=1, Resistor Type=Wirewound, Tolerance=25%, Voltage Rating=50V, Case/Package=0805, Current Rating=330mA, DC Current=330mA, Depth=1.2mm, Height=0.9mm, Impedance=90R, Lead Free="Lead Free", Length=2mm, Max DC Current=330mA, Military Standard=Not, Mount="Surface Mount", Number of Lines=2, Packaging="Tape and Reel", Radiation Hardening=No, Shielding=Unshielded, Termination=SMD/SMT, Test Frequency=100MHz, Weight=0.000317oz, Width=0.047inch
Q1: library part CMP-83955-000006-1, "MOSFET N-CH 30V 5.7A SOT23", Case/Package=SOT-23, Continuous Drain Current (ID)=5.7A, Drain to Source Voltage (Vdss)=30V, Gate to Source Voltage (Vgs)=12V, Input Capacitance=630pF, JLCPCB=C20917, Max Operating Temperature=150°C, Max Power Dissipation=1.4W, Min Operating Temperature=-55°C, Lead Free="Lead Free", Mount="Surface Mount", Number of Elements=1, Number of Pins=3, Packaging="Tape and Reel", Power Dissipation=1.4W, Radiation Hardening=No, Rds On Max=26.5mR
R1 R2 R7 R8 R9 R13: library part CMP-2002-05746-1, JLCPCB=C25905, Manufacturer="TE Connectivity / AMP", Part Number=CRG0402F5K1
R3 R6: library part CMP-009-00082-2, "22R 0.063W 5% 0402 (1005 Metric)  SMD", Case/Package=0402, JLCPCB=C25092, Power=63mW, Tolerance=5%, Mounting Technology=SMT, Pins=2
R4 R5 R10 R11 R12: library part CMP-009-00009-5, "Chip Resistor, 1 KOhm, +/- 1%, 0.1 W, -55 to 155 degC, 0402 (1005 Metric)", Case/Package=0402, JLCPCB=C11702, Max Operating Temperature=155°C, Min Operating Temperature=-55°C, Power=100mW, Tolerance=1%, Voltage Rating=50V, Mounting Technology=SM, Pins=2, RoHS Compliant=True
R14: library part CMP-2002-05746-1, JLCPCB=C25741, Manufacturer="TE Connectivity / AMP", Part Number=CRG0402F5K1
U1 U2: "18 V, 1 A fixed 3.3 V LDO regulator; TI KVU (TO-252)", JLCPCB=C41835077, Manufacturer="Texas Instruments", Manufacturer Part Number=TLV76133KVUR, Output Current="1 A", Output Voltage="3.3 V", Package="KVU (TO-252-3)", Datasheet=https://www.ti.com/lit/gpn/TLV761
U3: "Mainstream Arm Cortex-M0+ MCU with 128 Kbytes of Flash memory, 24 Kbytes RAM, 48 MHz CPU, 2x USART, timers, ADC, comm. I/F, USB FS, 2-3.6V", Manufacturer_Name=STMicroelectronics, Copyright="Copyright (C) 2026 Ultra Librarian. All rights reserved.", Datasheet=https://www.st.com/resource/en/datasheet/stm32c071c8.pdf, Manufacturer_Part_Number=STM32C071FBP6, RefDes=RefDes, Type=Type
U4: "Septentrio mosaic-G5 T multi-frequency GNSS timing receiver module, manufacturer part 410504. The 40 internal ground lands are represented by logical pin G and must be tied to ground. Pin 5 (ANT_2) is unsupported on the single-antenna T model and must be left unconnected."
U5 U6: "1.8V,2.5V or 3.3V asynchronous 8 channel output LVCMOS buffer 16-TSSOP -40 to 125", Manufacturer_Name="Texas Instruments", Copyright="Copyright (C) 2026 Ultra Librarian. All rights reserved.", Manufacturer_Part_Number=LMK1C1108APWR, RefDes=RefDes, Type=Type
U7: library part CMP-04948-000036-1, "TEMPERATURE SENSOR", JLCPCB=C699536, Max Operating Temperature=150°C, Min Operating Temperature=-55°C, Mount="Surface Mount", Output Type=I2C, Packaging="Cut Tape", Resolution=16b, RoHS Compliant=Yes
Y1: "SiTime SiT5801 10 MHz digitally controlled precision OCXO, exact AB-KV033JV-10 ordering variant", Frequency="10 MHz", Frequency Stability="±3 ppb", Manufacturer=SiTime, Operating Temperature="-40 to +95 °C", Supply Voltage="3.3 V", Control Interface="I2C, factory-programmed address code 0", Datasheet="SiT5801 Rev 0.26 (2023-05-04)", Manufacturer Part Number=SIT5801AB-KV033JV-10, Output="Regulated LVCMOS", Pull Clamp="±3.125 ppm"

## Free pads (board coordinates)
  round 5 hole 3.2: GND(3.127,3.127) GND(3.127,92.127) GND(87.127,3.127) GND(87.127,92.127)

## Via types
v1: diameter 0.45, hole 0.3, Top L1 to Bot GND L4, tented both sides, 674 vias
v2: diameter 0.4, hole 0.3, Top L1 to Bot GND L4, tented both sides, 1 vias

## Nets (pads, with @x,y where several pads share a name; then routed paths per layer and width w, separated by ;. In a path a pad name is that pad's centre, name@x,y a point inside that pad or via, vN(x,y) a via of type N, cw(c..) or ccw(c..) an arc to the next point about the centre after c; other vN are vias at no path point)
10MHz: U5.1 Y1.6 | length 21.6
  Top L1 w0.248: v1(41,53) Y1.6@41.925,53 Y1.6@42.45,53 Y1.6@42.975,53 ; v1(55.647,57.292) 55.655,57.284 57.07,57.284 U5.1@57.079,57.275
  CLK L3 w0.22: v1(41,53) 41,56 42.335,57.335 47.451,57.335 47.493,57.292 v1(55.647,57.292)
10MHz_1: J3.1 U5.16 | length 41.8
  Top L1 w0.248: U5.16@62.921,57.275 62.933,57.287 64.287,57.287 v1(64.3,57.3)
  CLK L3 w0.22: v1(64.3,57.3) 64.3,69.3 70.65,75.65 70.728,75.728 ccw(c70.403,76.053) 70.728,76.378 70.671,76.435 cw(c70.996,76.76) 70.671,77.085 cw(c70.996,76.76) 71.321,77.085 71.378,77.028 ccw(c71.703,77.353) 72.028,77.028 75.6,80.6 80,85 J3.1@85,85
10MHz_2: J7.1 U5.15 | length 42.2
  Top L1 w0.248: U5.15@62.921,56.625 62.933,56.612 64.288,56.612 v1(64.3,56.6)
  CLK L3 w0.22: v1(64.3,56.6) 65.6,56.6 67,58 67,62 67.7,62.7 67.778,62.778 ccw(c67.453,63.103) 67.778,63.428 67.721,63.485 cw(c68.046,63.81) 67.721,64.135 cw(c68.046,63.81) 68.371,64.135 69.135,63.371 ccw(c69.46,63.696) 69.785,63.371 ccw(c69.46,63.696) 69.785,64.021 69.021,64.785 cw(c69.347,65.11) 69.021,65.436 cw(c69.347,65.11) 69.672,65.436 70.436,64.672 ccw(c70.761,64.997) 71.086,64.672 ccw(c70.761,64.997) 71.086,65.322 70.322,66.086 cw(c70.647,66.411) 70.322,66.736 cw(c70.647,66.411) 70.972,66.736 71.545,66.163 ccw(c71.87,66.489) 72.195,66.163 ccw(c71.87,66.489) 72.195,66.814 71.679,67.33 cw(c72.004,67.655) 71.679,67.98 cw(c72.004,67.655) 72.33,67.98 ccw(c72.655,68.305) 72.98,67.98 78.1,73.1 80,75 J7.1@85,75